# Altium PCB Control-Board-v4.0.PcbDoc (part 3 of 3)
Units mil, origin at the board's own origin, x right, y up, seen from the top; angles counter-clockwise.
Board outline 1665.35 x 1665.35 mil, 2 copper layers (Top Layer, Bottom Layer), stack 61.811 mil thick; 81 components, 75 nets, 357 pads, 145 vias.
Unrouted connection lines stored in the file: 74.
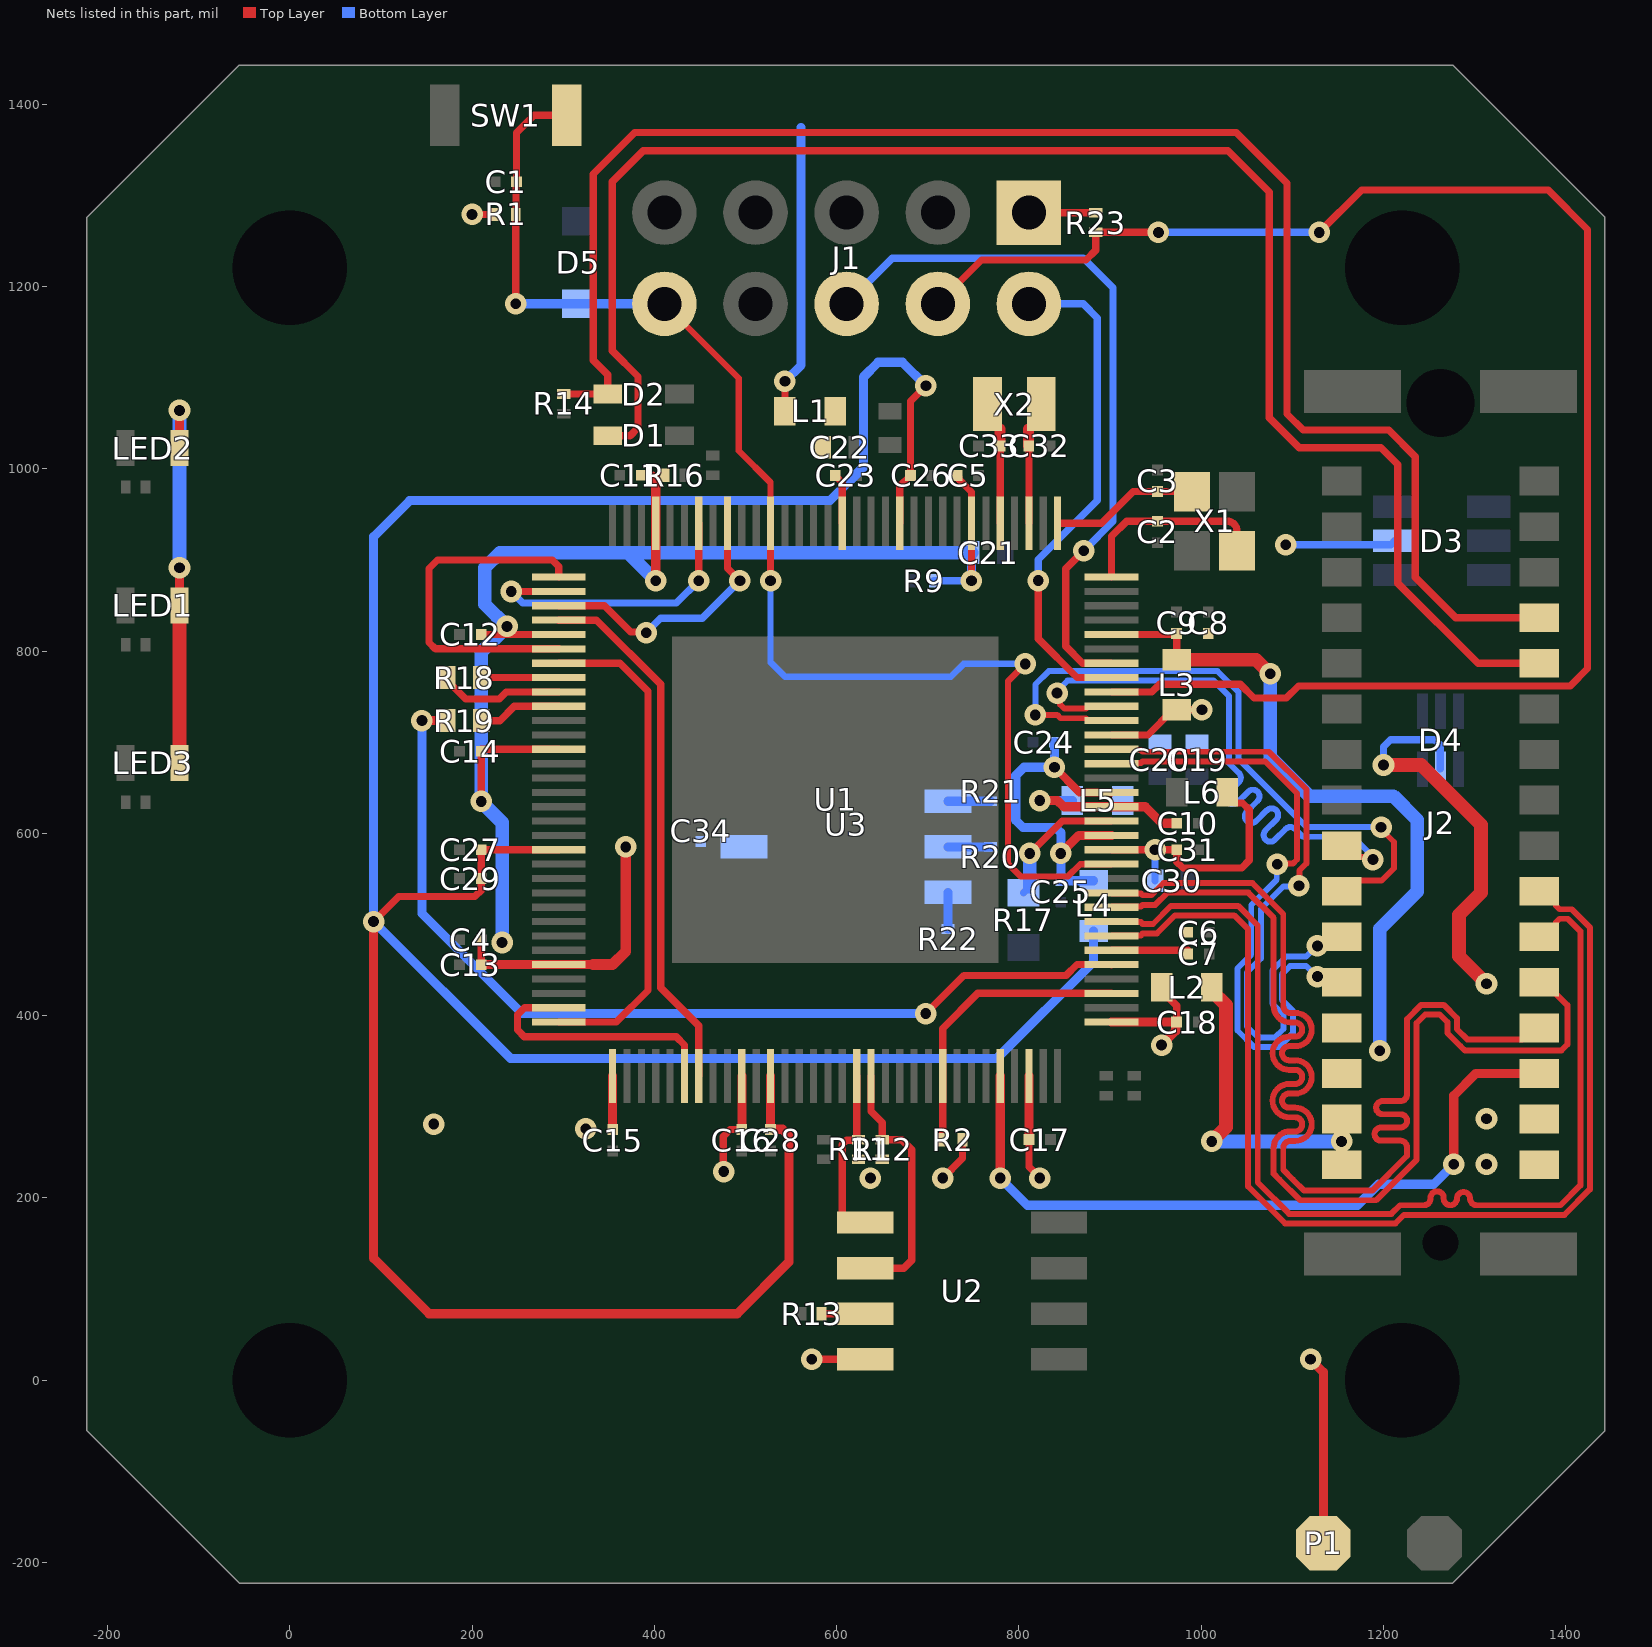
[diagram p2: the nets of this part, all layers, seen from the top]

## Via types
v1: diameter 23.62, hole 11.81, Top Layer to Bottom Layer, tented both sides, 145 vias

## Nets (pads, with @x,y where several pads share a name; then routed paths per layer and width w, separated by ;. In a path a pad name is that pad's centre, name@x,y a point inside that pad or via, vN(x,y) a via of type N, cw(c..) or ccw(c..) an arc to the next point about the centre after c; other vN are vias at no path point) (continued)
NetR13_1: R13.1 U2.7 | length 47.9
  Top Layer w8: R13.1@583.43,73 U2.7@631.35,73
NetR17_1: R17.1 U1.111 | length 150.4
  Top Layer w8: v1(812,578) 847.46,613.46 U1.111@901.51,613.46
  Bottom Layer w8: R17.1@805,534.72 R17.1@812,541.72
  Bottom Layer w15: R17.1@812,541.72 v1(812,578)
NetR18_1: R18.1 U1.40 | length 85.2
  Top Layer w8: R18.1@210,770.94 U1.40@295.21,770.94
NetR19_1: R19.1 U1.42 | length 91.7
  Top Layer w8: R19.1@210,723.7 230.69,723.7 246.43,739.45 U1.42@295.21,739.45
NetR20_2: R20.2 U3.3 | length 46.7
  Bottom Layer w10: U3.3@722.24,585.24 R20.2@768.92,585.24
NetR21_2: R21.2 U3.2 | length 46.7
  Bottom Layer w10: U3.2@722.24,635.24 R21.2@768.92,635.24
NetR22_2: R22.2 U3.4 | length 40.2
  Bottom Layer w10: R22.2@722.24,495 U3.4@722.24,535.24
PHY_IRQn: R2.1 U1.88 U1.99 | length 323
  Top Layer w8: R2.1@716.47,264 U1.88@716.47,333.94 716.47,386.01 754.95,424.49 U1.99@901.51,424.49
PUMP: J2.A3 U1.92 | length 819.8
  Top Layer w10: v1(779.46,221.76) U1.92@779.46,333.94 ; v1(1277,237) 1277,312.28 1301.25,336.54 J2.A3@1370.83,336.54
  Bottom Layer w10: v1(779.46,221.76) 809.23,192 1171.5,192 1194.5,215 1255,215 v1(1277,237)
QSPI_CLK: R18.2 U1.41 | length 137.2
  Top Layer w8: R18.2@173,770.94 173,767.44 192.94,747.51 229.75,747.51 237.44,755.2 U1.41@295.21,755.2
QSPI_CS: R19.2 U1.101 | length 1063.8
  Top Layer w8: v1(697.79,402.28) 739.68,444.17 851.88,444.17 863.76,456.05 901.45,456.05 U1.101@901.51,455.98
  Top Layer w10: v1(145,723.7) R19.2@173,723.7
  Bottom Layer w10: v1(145,723.7) 145,512.21 254.92,402.28 v1(697.79,402.28)
QSPI_SIO0: U1.33 U1.38 | length 387.3
  Top Layer w8: U1.38@295.21,802.44 159.8,802.44 152.77,809.47 152.77,890.54 162.17,899.94 288.09,899.94 295.21,892.81 U1.33@295.21,881.18
QSPI_SIO1: U1.26 U1.34 | length 336.3
  Top Layer w8: v1@243.06,865.43 U1.34@295.21,865.43 ; v1(448.76,877.24) U1.26@448.76,940.24
  Bottom Layer w8: v1(243,865.37) 255.68,852.69 424.2,852.69 v1(448.76,877.24)
QSPI_SIO2: U1.24 U1.35 | length 303.3
  Top Layer w8: U1.35@295.21,849.68 345.33,849.68 374.17,820.84 390.16,820.84 v1(391,820) ; U1.24@480.25,940.24 480.25,890.87 v1(493.87,877.24)
  Bottom Layer w8: v1(391,820) 406.86,835.86 452.49,835.86 v1(493.87,877.24)
QSPI_SIO3: U1.36 U1.71 | length 587.8
  Top Layer w8: U1.36@295.21,833.94 336.55,833.94 407,763.49 407,430.73 448.76,388.97 U1.71@448.76,333.94
RST: C1.1 D5.1 J1.10 R1.2 SW1.1 U1.21 U1.108 | length 1509
  Top Layer w7: J1.10@411,1181 492.61,1099.39 492.61,1019.9 527.5,985.02 U1.21@527.5,940.24 ; v1(807,785.89) 788,766.89 788,566.61 801.93,552.68 853.68,552.68 867.21,566.21 U1.108@901.51,566.22
  Top Layer w8: v1(247.83,1181) R1.2@247.83,1279 248.32,1279.49 R1.2@248.32,1283 ; R1.2@247.83,1283 R1.2@248.32,1283 ; R1.2@248.81,1283 R1.2@248.32,1283 ; SW1.1@303.93,1388 268,1388 248.81,1368.81 C1.1@248.81,1315 248.32,1314.51 R1.2@248.32,1283 ; v1(527.5,877.24) U1.21@527.5,940.24
  Bottom Layer w7: v1@527.5,885.12 v1(527.5,877.24) 527.5,787.57 543.37,771.69 725.29,771.69 739.49,785.89 v1(807,785.89)
  Bottom Layer w10: v1(247.83,1181) J1.10@411,1181
RXA_N: J2.A7 U1.103 | length 1216.5
  Top Layer w6.5: U1.103@901.51,487.48 902.2,488.17 933.7,488.17 935.64,490.1 951.38,490.1 971.28,510 1036.15,510 1051.5,494.65 1051.5,212.65 1092.15,172 1213,172 1222.5,181.5 1398.5,181.5 1426.42,209.42 1426.42,496.94 1406.58,516.79 1393.04,516.79 1389.23,520.59 1389.23,524.04 1376.73,536.54 J2.A7@1370.83,536.54
RXA_P: J2.A6 U1.104 | length 1216.5
  Top Layer w6.5: U1.104@901.51,503.23 902.2,502.54 933.7,502.54 935.64,500.6 947.03,500.6 966.93,520.5 1040.5,520.5 1062,499 1062,217 1096.5,182.5 1208.65,182.5 1218.15,192 1241.03,192 1244.28,192 ccw(c1244.28,199.25) 1251.53,199.25 1251.53,200.09 cw(c1258.78,200.09) 1266.03,200.09 1266.03,199.25 ccw(c1273.28,199.25) 1280.53,199.25 cw(c1287.78,199.25) 1295.03,199.25 ccw(c1302.28,199.25) 1302.28,192 1319.38,192 1394.15,192 1415.92,213.77 1415.92,492.59 1402.23,506.29 1393.04,506.29 1389.23,502.48 1389.23,499.03 1376.73,486.54 J2.A6@1370.83,486.54
RXB_N: J2.B8 U1.119 | length 742.5
  Top Layer w6.5: v1(841.86,753.86) 845.14,750.59 845.14,741.62 849.93,736.82 873.3,736.82 875.92,739.45 U1.119@901.51,739.45 ; J2.B8@1154.29,586.54 1166.79,574.04 1185.65,574.04 v1(1188.41,571.28)
  Bottom Layer w6.5: v1(841.86,753.86) 841.86,756.11 853.29,767.54 1013.59,767.54 1030.63,750.5 1030.63,680.72 1030.63,676.99 1031.06,676.56 1041.32,666.3 cw(c1036.19,661.18) 1041.32,656.05 1029.56,644.3 ccw(c1034.69,639.17) 1029.56,634.04 ccw(c1034.69,639.17) 1039.81,634.04 1051.57,645.8 cw(c1056.69,640.67) 1061.82,645.8 cw(c1056.69,640.67) 1061.82,635.54 1050.07,623.79 ccw(c1055.19,618.66) 1050.07,613.54 ccw(c1055.19,618.66) 1060.32,613.54 1072.07,625.29 cw(c1077.2,620.16) 1082.33,625.29 cw(c1077.2,620.16) 1082.33,615.04 1070.57,603.28 ccw(c1075.7,598.16) 1070.57,593.03 ccw(c1075.7,598.16) 1080.83,593.03 1092.58,604.78 cw(c1097.71,599.66) 1102.83,604.78 1108.76,598.86 1111.05,596.56 1111.35,596.27 1166.37,596.27 1188.41,574.23 v1(1188.41,571.28)
RXB_P: J2.B7 U1.118 | length 737.3
  Top Layer w6.5: v1(818,730) 841.91,730 845.58,726.32 873.3,726.32 875.92,723.7 U1.118@901.51,723.7 ; J2.B7@1154.29,536.54 1165.97,548.22 1197.96,548.22 1211.47,561.73 1211.47,590.46 1197.29,604.64 v1(1197.29,606.77)
  Bottom Layer w6.5: v1(818,730) 818,763.28 832.75,778.04 1017.94,778.04 1041.13,754.85 1041.13,681.34 1115.7,606.77 v1(1197.29,606.77)
SCL: R12.2 U1.83 U2.6 | length 287.8
  Top Layer w8: U2.6@631.35,123 673.6,123 682.31,131.72 682.31,253.09 671.41,264 R12.2@650,264 650,282.88 637.73,295.14 U1.83@637.73,333.94
SDA: R11.2 U1.82 U2.5 | length 194.6
  Top Layer w8: R11.2@621.98,265.32 U1.82@621.98,333.94 ; R11.2@624,264 623.43,263.43 610.92,263.43 606.24,258.74 606.24,181.2 614.44,173 U2.5@631.35,173
SWDCLK: J1.4 R23.1 U1.120 | length 1821.2
  Top Layer w8: J1.4@711,1181 759,1229 873.5,1229 884.23,1239.73 R23.1@884.23,1259.35 v1(953,1259.35) ; U1.120@901.51,755.2 945.89,755.2 954.41,763.72 1042.73,763.72 1058,748.45 1093.33,748.45 1106.66,761.79 1404.79,761.79 1423.86,780.86 1423.86,1262.52 1380.6,1305.78 1176.06,1305.78 v1(1129.62,1259.35)
  Bottom Layer w8: v1(953,1259.35) v1(1129.62,1259.35)
SWDIO: J1.2 U1.121 | length 558.1
  Top Layer w8: v1(821.28,877.39) 821.28,813.47 863.81,770.94 U1.121@901.51,770.94
  Bottom Layer w8: J1.2@811,1181 870.46,1181 886,1165.46 886,965.1 821.28,900.38 v1(821.28,877.39)
SWO: J1.6 U1.122 | length 799.3
  Top Layer w8: v1(871,910) 851.22,890.22 851.22,805.23 869.75,786.69 U1.122@901.51,786.69
  Bottom Layer w8: J1.6@611,1181 661,1231 870.9,1231 903.28,1198.61 903.28,942.28 v1(871,910)
SYNC0: U1.63 U1.70 | length 289.1
  Top Layer w8: U1.63@295.21,408.74 257.48,408.74 249.98,401.24 249.98,384.25 257.23,377 423.92,377 433.01,367.91 U1.70@433.01,333.94
SYNC1: U1.39 U1.64 | length 551
  Top Layer w8: U1.64@295.21,392.99 358.31,392.99 393,427.68 393,756.09 362.4,786.69 U1.39@295.21,786.69
TXA_N: J2.A5 U1.105 | length 1219.9
  Top Layer w6.5: U1.105@901.51,518.98 902.2,519.66 933.7,519.66 935.64,521.6 949.6,521.6 963,535 1051.77,535 1079.5,507.27 1079.5,451.51 1079.5,410.78 ccw(c1097.75,410.78) 1097.75,392.53 1103.04,392.53 cw(c1103.04,384.78) 1110.79,384.78 cw(c1103.04,384.78) 1103.04,377.03 1096.5,377.03 ccw(c1096.5,358.78) 1078.25,358.78 ccw(c1096.5,358.78) 1096.5,340.53 1103.04,340.53 cw(c1103.04,332.78) 1110.79,332.78 cw(c1103.04,332.78) 1103.04,325.03 1096.5,325.03 ccw(c1096.5,306.78) 1078.25,306.78 ccw(c1096.5,306.78) 1096.5,288.53 1103.04,288.53 cw(c1103.04,280.78) 1110.79,280.78 cw(c1103.04,280.78) 1103.04,273.03 1097.75,273.03 ccw(c1097.75,254.78) 1079.5,254.78 1079.5,226.52 1085.74,220.28 1108.52,197.5 1191.99,197.5 1236.29,241.81 1236.29,335.75 1236.29,391.9 1245.75,401.36 1261.64,401.36 1269.98,393.02 1269.98,381.04 1284.45,366.58 1288.32,362.7 1289.29,361.74 1395.1,361.74 1401.73,368.37 1401.73,411.54 1376.73,436.54 J2.A5@1370.83,436.54
TXA_P: J2.A4 U1.106 | length 1220.3
  Top Layer w6.5: U1.106@901.51,534.72 902.2,534.04 933.7,534.04 935.64,532.1 945.25,532.1 958.65,545.5 1056.12,545.5 1090,511.62 1090,451.51 1090,410.78 ccw(c1097.75,410.78) 1097.75,403.03 1103.04,403.03 cw(c1103.04,384.78) 1121.29,384.78 cw(c1103.04,384.78) 1103.04,366.53 1096.5,366.53 ccw(c1096.5,358.78) 1088.75,358.78 ccw(c1096.5,358.78) 1096.5,351.03 1103.04,351.03 cw(c1103.04,332.78) 1121.29,332.78 cw(c1103.04,332.78) 1103.04,314.53 1096.5,314.53 ccw(c1096.5,306.78) 1088.75,306.78 ccw(c1096.5,306.78) 1096.5,299.03 1103.04,299.03 cw(c1103.04,280.78) 1121.29,280.78 cw(c1103.04,280.78) 1103.04,262.53 1097.75,262.53 ccw(c1097.75,254.78) 1090,254.78 1090,230.87 1100.58,220.28 1112.87,208 1187.64,208 1225.79,246.15 1225.79,252.31 1225.79,255.56 ccw(c1218.54,255.56) 1218.54,262.81 1197.45,262.81 cw(c1197.45,270.06) 1197.45,277.31 1218.54,277.31 ccw(c1218.54,284.56) 1218.54,291.81 1199.17,291.81 cw(c1199.17,299.06) 1199.17,306.31 1218.54,306.31 ccw(c1218.54,313.56) 1225.79,313.56 1225.79,335.75 1225.79,396.25 1241.4,411.86 1265.99,411.86 1280.48,397.37 1280.48,385.39 1291.88,374 1348.62,374 1348.65,374.04 1352.42,374.04 1364.92,386.54 J2.A4@1370.83,386.54
TXB_N: J2.B6 U1.116 | length 731.6
  Top Layer w6.5: U1.116@901.51,692.2 902.2,691.52 933.7,691.52 935.64,689.58 1074.27,689.58 1115.53,648.32 1115.53,567.07 1107.81,559.36 1107.81,543.01 v1(1107.24,542.44) ; J2.B6@1135.89,474.04 1148.39,486.54 J2.B6@1154.29,486.54
  Bottom Layer w6.5: v1(1107.24,542.44) 1106.67,541.86 1090.32,541.86 1065.43,516.97 1065.43,462.65 1050.31,447.53 1050.31,388.11 1062.47,375.95 1080.85,375.95 1090.32,385.42 1090.32,400.85 1077.96,413.21 1077.96,449.72 1093.18,464.94 1115.13,464.94 1126.69,476.5 v1(1127.5,476.5)
TXB_P: J2.B5 U1.115 | length 731.6
  Top Layer w6.5: U1.115@901.51,676.46 902.2,677.14 933.7,677.14 935.64,679.08 1069.92,679.08 1105.03,643.97 1105.03,571.42 1100.39,566.78 1084.04,566.78 v1(1083.47,566.21) ; J2.B5@1135.89,449.03 1148.39,436.54 J2.B5@1154.29,436.54
  Bottom Layer w6.5: v1(1083.47,566.21) 1082.9,565.64 1082.9,549.29 1054.93,521.32 1054.93,467 1039.81,451.88 1039.81,383.76 1058.12,365.45 1085.2,365.45 1100.82,381.07 1100.82,405.2 1088.46,417.56 1088.46,445.37 1097.53,454.44 1115.13,454.44 1126.69,442.88 v1(1127.5,442.88)
UART-RX: D2.2 J2.A13 R14.2 | length 1799.2
  Top Layer w8: R14.2@300.68,1082 D2.2@348.77,1082 348.77,1103.25 333.02,1119 333.02,1323.46 378.56,1369 1038.59,1369 1094.2,1313.4 1094.2,1060.16 1111.86,1042.5 1205.68,1042.5 1234.83,1013.35 1234.83,880.94 1279.23,836.54 J2.A13@1370.83,836.54
UART-TX: D1.2 J2.A12 | length 1803.9
  Top Layer w8: D1.2@348.77,1036.32 373.41,1036.32 381.97,1044.87 381.97,1101.34 353.82,1129.49 353.82,1314.83 387.99,1349 1029.34,1349 1074.75,1303.59 1074.75,1055.9 1107.64,1023.01 1197.29,1023.01 1215.64,1004.66 1215.64,874.49 1303.6,786.54 J2.A12@1370.83,786.54
VCC-3V3: C4.1 C5.1 C11.1 C12.1 C13.1 C14.1 C15.1 C16.1 C17.1 C18.1 C19.1 C20.1 C21.1 C34.2 D3.5 D4.5 J1.1 J2.A1 J2.A2 L1.1 L2.1 L3.1 L5.1 LED1.1 LED2.1 LED3.1 P1.1 R1.1 R2.2 R9.2 R11.1 R12.1 R16.2 R23.2 U1.7 U1.29 U1.37 U1.45 U1.60 U1.65 U1.74 U1.94 U1.97 U1.117 U2.8 U3.6 | length 4158.4
  Top Layer w8: v1(200,1279) R1.1@226.17,1279 ; C13.1@210,455.98 C4.1@210,480.26 ; v1(210,635) 210,692.2 U1.45@295.21,692.2 ; C12.1@210,818.19 U1.37@295.21,818.19 ; C15.1@353.5,276.01 C15.1@354.27,275.24 ; 398.08,993 398.23,993 401.51,989.72 ; R16.2@411.17,991.03 R16.2@411.17,993 ; v1(476.08,228.99) 475.72,229.35 475.72,267.52 483.33,275.12 495.89,275.12 C16.1@496,275.24 ; L1.1@543.24,1063.14 v1(543.24,1096) ; v1(572.61,23) U2.8@631.35,23 ; v1(716.47,221.76) 738.13,243.42 R2.2@738.13,264 ; C5.1@731.98,992.72 733.89,990.81 733.89,988.48 747.91,974.46 747.91,940.3 U1.7@747.97,940.24 ; v1@747.94,877.28 U1.7@747.94,940.2 ; C17.1@810.96,264 810.96,234.26 822.77,222.45 v1(822.77,221.76) ; J1.1@811,1281 R23.2@884.23,1281 ; U1.117@901.51,707.95 941.57,707.95 969.1,735.48 v1(1000.84,735.51) v1(1000.84,735.51) ; L2.1@956.48,431.11 956.48,427.17 964.29,419.36 964.53,419.36 973,410.9 C18.1@973,392.99
  Top Layer w10: LED1.1@-120.95,850 v1(-120.95,891.33) ; LED2.1@-120.94,1022.67 v1(-120.95,1064) ; C13.1@210,455.98 332.98,455.98 ; C15.1@354.27,275.24 U1.65@354.27,333.94 ; v1(401.51,877.24) U1.29@401.51,940.24 401.51,989.72 ; C16.1@496,275.24 U1.74@496,333.94 ; C17.1@810.96,264 U1.94@810.96,333.94 ; U1.97@901.51,392.99 C18.1@973,392.99 972.09,392.09 972.09,383.37 v1(956.48,367.75) ; v1(1120,23) 1134,9 P1.1@1134,-179
  Top Layer w12: 332.98,455.98 354.27,455.98 368.63,470.34 v1(368.63,585.09)
  Top Layer w15: LED3.1@-120.95,677.33 LED1.1@-120.95,850 ; v1(1200,675) 1241.4,675 1306.99,609.41 1306.99,534.84 1282.88,510.73 1282.88,465.12 v1(1313,435)
  Bottom Layer w8: R9.2@706.63,877.24 v1(747.91,877.24) ; v1(1092.8,916.7) 1208.13,916.7 D3.5@1212.43,921 ; v1(1200,675) 1200,694.98 1207.65,702.64 1256.04,702.64 1262.14,696.54 1262.14,671.01 D4.5@1262.56,670.59
  Bottom Layer w10: v1(543.24,1096) 561,1113.76 561,1374.23 ; v1(747.91,877.24) 747.95,877.29 C21.1@748,908
  Bottom Layer w15: v1(-120.95,891.33) v1(-120.95,1064) ; v1(233,480.26) 233,612 v1(210,635) 210,798.65 v1(238.35,827) 214,851.35 214,891.33 230.62,907.95 370.8,907.95 ; v1(401.51,877.24) 370.8,907.95 ; C21.1@748,908 370.8,907.95
  other v1: 637.08,221.76 1313,237 324.74,276.01 158,281 1313,287
VDD12: C24.1 C25.1 L4.2 U1.110 U1.113 | length 404.2
  Top Layer w9: v1(839,672.56) 866.6,644.96 U1.113@901.51,644.96
  Top Layer w10: v1(846,578) 865.72,597.72 U1.110@901.51,597.72
  Bottom Layer w10: C24.1@839,700 v1(839,672.56) 805.54,672.56 796.51,663.52 796.51,614.44 804.4,606.55 840.14,606.55 846,600.69 v1(846,578) C25.1@846,548.03 ; C25.1@846,548.03 L4.2@882,548
VDD-CORE: C30.1 C31.1 L6.2 U1.109 | length 294.4
  Top Layer w8: U1.109@901.51,581.97 v1(949.38,581.97) C31.1@973.28,581.97 973.28,568.89 980.1,562.07 1044.34,562.07 1052.64,570.38 1052.64,626.07 1045.34,633.37 1036.21,633.37 1028.4,641.18 L6.2@1028.4,644.96
  Bottom Layer w8: C30.1@949.38,548 v1(949.38,581.97)
VDD-CR: C26.1 C27.1 C28.1 C29.1 L4.1 U1.12 U1.52 U1.76 | length 3623.7
  Top Layer w8: v1(92,503.23) 119.56,530.79 203.11,530.79 210,537.68 C29.1@210,550.47 C27.1@210,581.97 U1.52@295.21,581.97 ; U1.12@669.23,940.24 669.29,940.3 669.29,980.97 C26.1@681.04,992.72 681.04,1074.04 v1(698,1091)
  Top Layer w10: v1(92,503.23) 92,133.86 152.86,73 490.97,73 547.77,129.8 547.77,268.01 540.45,275.33 527.59,275.33 C28.1@527.5,275.24 U1.76@527.5,333.94
  Bottom Layer w10: v1(92,503.23) 91.99,925.51 131.48,965 592.53,965 629.48,1001.95 629.48,1100.73 645.58,1116.83 672.17,1116.83 v1(698,1091) ; v1@92.7,502.52 242.27,352.95 775.87,352.95 882,459.08 L4.1@882,492.88
VDDANA: C22.1 C23.1 L1.2 U1.16 | length 55.7
  Top Layer w8: C23.1@598.36,992.72 606.24,984.84 U1.16@606.24,940.24
VDDBIAS: C10.1 L5.2 U1.112 | length 196.7
  Top Layer w10: v1(822.81,636.01) 842.32,636.01 849.12,629.21 U1.112@901.51,629.21 938.56,629.21 956.69,611.09 C10.1@973.28,611.09
  Bottom Layer w10: v1(822.81,636.01) L5.2@858.69,636.01
VDDTXRX1: C6.1 C7.1 J2.B1 J2.B2 L2.2 U1.102 | length 422.8
  Top Layer w8: U1.102@901.51,471.73 C7.1@985.09,471.73 ; L2.2@1003.79,442.72 1011.6,434.91 L2.2@1011.6,427.17
  Top Layer w15: v1(1011.6,262) 1027.16,277.56 1027.16,411.61 L2.2@1011.6,427.17
  Bottom Layer w15: v1(1011.6,262) v1(1154,262)
VDDTXRX2: C8.1 C9.1 J2.B3 J2.B4 L3.2 U1.124 | length 761.2
  Top Layer w8: U1.124@901.51,818.19 901.57,818.25 972.08,818.25 C9.1@973,819.17 L3.2@973,790.56
  Top Layer w15: L3.2@973.22,790.78 L3.2@973,790.56 1060.1,790.56 v1(1075.66,775)
  Bottom Layer w15: v1(1075.66,775) 1075.66,683.77 1118.59,640.84 1210.84,640.84 1236.97,614.71 1236.97,536.25 1196,495.28 v1(1196,361.54)
XIN32: C32.2 U1.3 X2.1 | length 136.2
  Top Layer w8: U1.3@810.96,940.24 C32.2@810.96,1024.76
  Top Layer w12: C32.2@810.72,1025 810.72,1043.42 824.53,1057.22 X2.1@824.53,1071
XOUT32: C33.2 U1.5 X2.2 | length 136.2
  Top Layer w8: U1.5@779.46,940.24 C33.2@779.46,1024.76
  Top Layer w12: X2.2@765.43,1071 765.43,1057.22 779.23,1043.42 C33.2@779.23,1025
XTAL_IN: C2.2 U1.128 X1.1 | length 217.1
  Top Layer w8: U1.128@901.51,881.18 901.51,925.89 918.14,942.52 C2.2@952,942.52 1028.39,942.52 cw(c1028.39,931.69) 1039.21,931.69 X1.1@1039.21,910.04
XTAL_OUT: C3.2 U1.1 X1.3 | length 161.9
  Top Layer w8: U1.1@842.46,940.24 890.6,940.24 925.36,975 C3.2@952,975 X1.3@990,975
pads on no net: J1.7 J1.8 J2.A16 J2.B16 J2.MH J2.MH1 U1.2 U1.4 U1.8 U1.9 U1.18 U1.20 U1.22 U1.23 U1.28 U1.30 U1.31 U1.32 U1.48 U1.49 U1.50 U1.51 U1.53 U1.54 U1.55 U1.56 U1.57 U1.58 U1.59 U1.66 U1.72 U1.75 U1.77 U1.78 U1.79 U1.80 U1.84 U1.85 U1.86 U1.87 U1.91 U1.93 U1.96 U1.100 U1.107 U1.123 U1.125 U1.126 U1.127 U3.1 U3.5 U3.8

## Polygon pours and split planes (outlines as drawn)
GND on Top Layer "GND_L01_P006" (solid, remove dead copper, pour order 6): -222.44,-55.41 -55.41,-222.44 1275.88,-222.44 1442.91,-55.41 1442.91,1275.88 1275.88,1442.91 -55.41,1442.91 -222.44,1275.88
GND on Top Layer "GND_L01_P003" (solid, pour order 3): 765.43,1334 765.43,1225 385,1225 370,1240 370,1315 389,1334
VCC-3V3 on Top Layer "VCC-3V3_L01_P002" (solid, pour order 2): 245,468 245,451 241,451 171.44,381.44 171.44,272.56 185,259 291,259 291,297.98 360.17,297.98 360.17,269.33 339.5,269.33 301.98,231.81 166.76,231.81 145,253.57 145,396 189.3,440.3 198.19,440.3 203,445.11 203,489.16 245,489.16
VCC-3V3 on Top Layer " " (solid, pour order 0): 700,234.26 700,52.89 682.31,35.2 556.46,35.2 556.46,10.8 692.06,10.8 727.3,46.03 727.3,234.26
GND on Bottom Layer "GND_L02_P004" (solid, pour order 4): 72,1233 72,1212 cw(c3.97,1212) -0.05,1144.09 ccw(c-2.52,1144.38) -5,1144.38 -5,1117 -5,598 69,524 77,524 81,528 81,935 125,979 588.05,979 615,1005.95 615,1105 637,1127 684.73,1127 715,1096.73 715,1072 672.17,1072 672,1071.83 672,929 767.5,929 767.5,865 801,865 801,929 831.5,929 875,972.5 875,1126 863,1138 697,1138 690,1145 631,1145 624,1138 574.58,1138 574.58,1096.14 553.44,1075 466,1075 466,1323 248,1323 248,1244 83,1244
GND on Bottom Layer "GND_L02_P005" (solid, remove dead copper, pour order 5): -222.44,-55.41 -55.41,-222.44 1275.88,-222.44 1442.91,-55.41 1442.91,1275.88 1275.88,1442.91 -55.41,1442.91 -222.44,1275.88
VCC-3V3 on Bottom Layer "VCC-3V3_L02_P001" (solid, pour order 1): -16,1253 -16,1119 -16,592 236,340 794.89,340 839.89,385 891.66,385 907.31,400.64 907.31,612.96 900,620.26 900,749.31 928,749.31 928,400.5 943.5,385 969,385 975,379 975,361 970,356 861,356 847.56,342.56 847.56,320 894.56,273 983.77,273 983.77,241 1180,241 1300,361 1300,450.58 1325,450.58 1325,4 1241,-80 555,-80 555,40 595,40 595,-39 945,-39 945,205 1244,205 880,205 880,245 835,245 835,210 810,210 810,245 734,245 734,210 611,210 611,256 490,256 490,210 460.08,210 460.08,264 304,264 254,314 200,314 174,288 174,264 142,264 142,333 -96,571 -96,806 -135,845 -135,1272 -22,1385 932,1385 932,1250 1111,1071 1111,903.8 1077,903.8 1077,1049 880.43,1245.57 775.57,1245.57 775.57,1337 238,1337 238,1253 76,1253

## Other copper
Top Layer:
  rectangle net VCC-3V3: 204.09,474.35 242.49,486.16
  rectangle net VDDANA: 575.98,986.81 604.27,1078.89
  rectangle net VDDANA: 575.98,1047.39 610.17,1078.89
  rectangle net VDDTXRX1: 1132.64,220.79 1175.94,302.28
  rectangle net GND: 970.31,836.89 1009.69,929
  rectangle net GND: 991,576.06 1033.96,617
  rectangle net VDDTXRX2: 1132.64,320.79 1208.15,402.28
  rectangle net VCC-3V3: 204.09,812.28 253,840
  rectangle net GND: 1132.64,770.79 1244,805
  rectangle net GND: 490.09,245.71 533.4,257.52
  rectangle net GND: 1132.64,770.79 1176,852.28
  rectangle net VCC-3V3: 1299,220.79 1392.48,302.28
  rectangle net VCC-3V3: 616.72,209.17 657.28,247.66
  rectangle net GND: 498.63,216.53 525,257.52
  rectangle net GND: 1002.81,468.82 1033.96,491.4
  rectangle net VDDTXRX1: 996.43,415.36 1023.41,446.86
  rectangle net VDDTXRX1: 979.19,437 1023.41,446.86
  rectangle net VDDTXRX1: 979.19,437 991,497.44
  rectangle net VDDTXRX2: 957.25,810 1013.65,825.08
  rectangle net VDDTXRX2: 957.25,778.75 988.75,825.08
  rectangle net VCC-3V3: 379.68,985.72 416.49,1000.28
  rectangle net VCC-3V3: 619,237.03 657.28,247.66
  pour cut-out: 1186.18,863 1205.82,863 1205.82,958.36 1186.18,958.36
  pour cut-out: 1243.56,914.65 1243.56,895 1342.44,895 1342.44,914.65
  pour cut-out: 1070.75,900.16 1070.75,880.57 1070.7,880.51 1118.42,880.51 1118.42,900.16
  pour cut-out: 1019.56,951 1019.56,931.35 1118.44,931.35 1118.44,951
  pour cut-out: 744.17,1061.52 744.17,1081.11 744.22,1081.16 690,1081.16 690,1061.52
  pour cut-out: 618.23,1039.28 637.82,1039.28 637.87,1039.23 637.87,1068.27 618.23,1068.27
  pour cut-out: 633.8,902 633.8,820.98 769,820.98 769,882.3 749.3,902
  pour cut-out: 325.07,1068.66 325.07,1049.06 325.01,1049.01 354.06,1049.01 354.06,1068.66
  pour cut-out: 369.84,1020.84 369.84,1001.25 369.79,1001.2 398.83,1001.2 398.83,1020.84
Bottom Layer:
  rectangle net GND: 977.38,535.5 1007.88,671.22
  rectangle net GND: 977.38,582 1031,610
  rectangle net GND: 942.25,620.26 1007.88,671.22
  rectangle net VCC-3V3: 902,690.22 1013,749.31
  rectangle net VCC-3V3: 900,620.26 925.62,749.31
  rectangle net GND: 575.57,1244 756,1327
  rectangle net GND: 500,210 600,245.71
  rectangle net VCC-3V3: 355,570 524.02,598.03
  rectangle net GND: 787.5,459.72 852,497
  rectangle net GND: 425,608.72 524.02,650
  pour cut-out: 1208,315.82 1208,596.27 1047.37,596.27 1047.37,315.82
  pour cut-out: 1015.48,680.39 1015.48,628.37 1045.69,598.16 1097.72,598.16
  pour cut-out: 1163.17,760.8 1163.17,741.15 1240.99,741.15 1240.99,760.8
  pour cut-out: 1244.44,904.28 1244.44,884.63 1281.53,884.63 1281.53,904.28
  pour cut-out: 1365.09,949 1345.5,949 1345.44,949.05 1345.44,892.77 1365.09,892.77
  pour cut-out: 1203.25,983.2 1203.25,1002.85 1120.01,1002.85 1120.01,983.2

## Silkscreen, mask and mechanical layers (free items; w line width, h text height)
Top Overlay:
  lines w5: 136.06,692 136.26,692.2 177.19,692.2 ; 136.06,770.94 160.5,770.94 ; 294,969.76 294,1018.32 281,1018.32 117,1018.32 117,965 294,965 294,976 ; 308.42,968.79 301.21,976 ; 308.42,983.21 301.21,976 ; 342.33,977.76 342.33,1010.77 447.42,1010.77 447.42,976 441,976 360.77,976 352.77,976 345,976 311,976 301.21,976 ; 424.94,1054.32 465,1054.32 465,1100 ; 457.79,1092.79 465,1100 ; 472.21,1092.79 465,1100 ; 473.03,247 473.03,223 473,223 674,223 674,234.17 674,285.24 546,285.24 ; 555.78,983.72 589.17,983.72 ; 627,1039.68 627,1115 722.8,1115 722.8,1057.5 674.54,1057.5 ; 631.17,983.72 646.77,983.72 646.77,1013.32 ; 658.54,1001.72 658.54,976 843.54,976 843.54,1016 ; 691,1012.64 691,1034 752.92,1034 ; 964,809.98 943,809.98 943,861.02 982,861.02 982,851.98 ; 147,-56 238,-56 375.86,-56 375.86,49.35 147,49.35 147,-56 ; 596,234.17 596,234.17 ; 971,1041 1067,1041 1067,1088 1109,1088 1109,1179 1059,1179 1059,1134.17 971,1134.17 971,1041 ; 974,1337 974,1387 1073,1387 1073,1428 1262,1428 1262,1376 1132,1376 1132,1337 974,1337 ; 1025.31,681 1075.31,681 1075.31,748.97 1025.31,748.97 1025.31,681
  text "JTAG" at 876.45,1403.41 h39.37
  text "RESET" at 21.98,1375.41 h39.37
  text "*" at 1138.66,1319.57 h59.06
  text "#" at 936.06,1092.39 h59.06
  text "#" at 527.86,987.11 h59.06
  text "*" at 850.2,958.57 h59.06
  text "~" at 946.15,855.92 h51.18
  text "~" at 1028.15,743.89 h51.18
  text "1" at 454.81,259.54 h51.18
  text "1" at 125.73,12.89 h51.18
  text "3V3" at 1089.15,-132.65 h59.06
  text "GND" at 1199.93,-132.89 h59.06
Bottom Overlay:
  text "GND" at 746.43,1330.18 h30
  text "3V3" at 843.76,1330.18 h30
  text "RST" at 444.54,1107.41 h39.37
  text "SWO" at 651.71,1107.41 h39.37
  text "CLK" at 746.29,1107.39 h39.37
  text "IO" at 832.37,1105.06 h30
  text "Rev-v4.0" at 770.85,-209.84 h78.74
Board Outline:
  the board outline again, w5
Fabrication:
  drawing of 191 lines, arcs and shapes, not listed
  text "Layer" at 2071.5,1361 h60
  text "Name" at 2481.41,1361 h60
  text "Material" at 3411.16,1361 h60
  text "Thickness" at 4270.92,1361 h60
  text "Constant" at 4920.76,1361 h60
  text "Board Layer Stack" at 5490.62,1361 h60
  text "Top Overlay" at 2481.41,1241 h60
  text "Top Solder" at 2481.41,1121 h60
  text "Solder Resist" at 3411.16,1121 h60
  text "0.010mm" at 4270.92,1121 h60
  text "4.4" at 4920.76,1121 h60
  text "1" at 2071.5,1001 h60
  text "Top Layer" at 2481.41,1001 h60
  text "0.035mm" at 4270.92,1001 h60
  text "Dielectric 1" at 2481.41,881 h60
  text "FR-4" at 3411.16,881 h60
  text "1.500mm" at 4270.92,881 h60
  text "4.6" at 4920.76,881 h60
  text "2" at 2071.5,761 h60
  text "Bottom Layer" at 2481.41,761 h60
  text "0.035mm" at 4270.92,761 h60
  text "Bottom Solder" at 2481.41,641 h60
  text "Solder Resist" at 3411.16,641 h60
  text "0.010mm" at 4270.92,641 h60
  text "4.4" at 4920.76,641 h60
  text "Bottom Overlay" at 2481.41,521 h60
  text "Total board thickness:" at 2071.5,401 h60
  text "1.590mm" at 4270.92,401 h60
Drill Drawing:
  circle w10: c-121.38,2961.27 r33.33
  lines w10: -154.71,2327.94 -121.38,2344.61 -88.04,2327.94 -104.71,2361.27 -88.04,2394.61 -121.38,2377.94 -154.71,2394.61 -138.04,2361.27 -154.71,2327.94 ; -154.71,2494.61 -138.04,2494.61 -121.38,2477.94 -104.71,2494.61 -88.04,2494.61 -104.71,2511.27 -88.04,2527.94 -104.71,2527.94 -121.38,2544.61 -138.04,2527.94 -154.71,2527.94 -138.04,2511.27 -154.71,2494.61 ; -154.71,2627.94 -88.04,2627.94 -88.04,2694.61 -154.71,2694.61 -154.71,2627.94 ; -154.71,2844.61 -88.04,2844.61 -121.38,2777.94 -154.71,2844.61
  lines w15: -214.5,2282.94 12903.82,2282.94 ; -214.5,3032.94 12903.82,3032.94 ; 336.38,2132.94 336.38,3182.94 ; 916.22,2132.94 916.22,3182.94 ; 2065.89,2132.94 2065.89,3182.94 ; 2571.76,2132.94 2571.76,3182.94 ; 3305.56,2132.94 3305.56,3182.94 ; 4805.12,2132.94 4805.12,3182.94 ; 5394.96,2132.94 5394.96,3182.94 ; 6140.76,2132.94 6140.76,3182.94 ; 6890.56,2132.94 6890.56,3182.94 ; 7744.32,2132.94 7744.32,3182.94 ; 9077.93,2132.94 9077.93,3182.94 ; 10411.53,2132.94 10411.53,3182.94 ; 11501.22,2132.94 11501.22,3182.94 ; -214.5,2132.94 12903.82,2132.94 12903.82,3182.94 -214.5,3182.94 -214.5,2132.94
  text "Symbol" at -124.5,3077.94 h72
  text "Count" at 381.38,3077.94 h72
  text "Hole Size" at 961.22,3077.94 h72
  text "Plated" at 2110.89,3077.94 h72
  text "Hole Type" at 2616.76,3077.94 h72
  text "Drill Layer Pair" at 3350.56,3077.94 h72
  text "Via/Pad" at 4850.12,3077.94 h72
  text "Pad Shape" at 5439.96,3077.94 h72
  text "Template" at 6185.76,3077.94 h72
  text "Description" at 6935.56,3077.94 h72
  text "Hole Tolerance (+)" at 7789.32,3077.94 h72
  text "Hole Tolerance (-)" at 9122.93,3077.94 h72
  text "Hole Length" at 10456.53,3077.94 h72
  text "Routed Path Length" at 11546.22,3077.94 h72
  text "1" at 381.38,2927.94 h60
  text "39.37mil (1.000mm)" at 961.22,2927.94 h60
  text "NPTH" at 2110.89,2927.94 h60
  text "Slot" at 2616.76,2927.94 h60
  text "Top Layer - Bottom Layer" at 3350.56,2927.94 h60
  text "Pad" at 4850.12,2927.94 h60
  text "Rounded" at 5439.96,2927.94 h60
  text "c0hn100_195" at 6185.76,2927.94 h60
  text "76.77mil (1.950mm)" at 10456.53,2927.94 h60
  text "37.40mil (0.950mm)" at 11546.22,2927.94 h60
  text "1" at 381.38,2777.94 h60
  text "74.80mil (1.900mm)" at 961.22,2777.94 h60
  text "NPTH" at 2110.89,2777.94 h60
  text "Slot" at 2616.76,2777.94 h60
  text "Top Layer - Bottom Layer" at 3350.56,2777.94 h60
  text "Pad" at 4850.12,2777.94 h60
  text "Rounded" at 5439.96,2777.94 h60
  text "c0hn190_195" at 6185.76,2777.94 h60
  text "76.77mil (1.950mm)" at 10456.53,2777.94 h60
  text "1.97mil (0.050mm)" at 11546.22,2777.94 h60
  text "4" at 381.38,2627.94 h60
  text "125.98mil (3.200mm)" at 961.22,2627.94 h60
  text "PTH" at 2110.89,2627.94 h60
  text "Round" at 2616.76,2627.94 h60
  text "Top Layer - Bottom Layer" at 3350.56,2627.94 h60
  text "Pad" at 4850.12,2627.94 h60
  text "Rounded" at 5439.96,2627.94 h60
  text "c0h320" at 6185.76,2627.94 h60
  text "-" at 10456.53,2627.94 h60
  text "-" at 11546.22,2627.94 h60
  text "10" at 381.38,2477.94 h60
  text "37.40mil (0.950mm)" at 961.22,2477.94 h60
  text "PTH" at 2110.89,2477.94 h60
  text "Round" at 2616.76,2477.94 h60
  text "Top Layer - Bottom Layer" at 3350.56,2477.94 h60
  text "Pad" at 4850.12,2477.94 h60
  text "(Mixed)" at 5439.96,2477.94 h60
  text "(Mixed)" at 6185.76,2477.94 h60
  text "-" at 10456.53,2477.94 h60
  text "-" at 11546.22,2477.94 h60
  text "145" at 381.38,2327.94 h60
  text "11.81mil (0.300mm)" at 961.22,2327.94 h60
  text "PTH" at 2110.89,2327.94 h60
  text "Round" at 2616.76,2327.94 h60
  text "Top Layer - Bottom Layer" at 3350.56,2327.94 h60
  text "Via" at 4850.12,2327.94 h60
  text "Rounded" at 5439.96,2327.94 h60
  text "v60h30m0mx0" at 6185.76,2327.94 h60
  text "-" at 10456.53,2327.94 h60
  text "-" at 11546.22,2327.94 h60
  text "161 Total" at 381.38,2177.94 h60
  text "Slot definitions :" at -124.5,2032.97 h60
  text "Routed Path Length" at 908.19,2032.97 h60
  text "= Calculated from tool start centre position to tool end centre position." at 2010.86,2032.97 h60
  text "Hole Length" at 908.19,1932.99 h60
  text "= Routed Path Length + Tool Size = Slot length as defined in the PCB layout" at 1600.99,1932.99 h60

## Dimensions
-222.44,-55.41 to 1442.91,-55.41 on Dimensions
1275.88,1442.91 to 1275.88,-222.44 on Dimensions

## Text inside footprints (layer, text, board x,y; h text height)
J1: Top Overlay "PCB Edge" at 760.25,1443 h31.5 r180
J2: Top Overlay "1" at 1392.83,199.54 h30 r90